# Altium PCB MainBoardPCB_PWR.PcbDoc (part 23 of 29)
Units mm, origin at the board's own origin, x right, y up, seen from the top; angles counter-clockwise.
Board outline 333.63 x 349.38 mm, 16 copper layers (L1, L2 (GND), L3 (Sign), L4 (GND), L5 (Sign), L6 (PWR/GND), L7(PWR/GND), L8 (PWR/GND), L9 (PWR/GND), L10 (PWR/GND), L11 (PWR/GND), L12 (Sign), L13 (GND), L14 (Sign), L15 (GND), L16), stack 2.503 mm thick; 2187 components, 1615 nets, 7987 pads, 1695 vias.
Unrouted connection lines stored in the file: 4757.
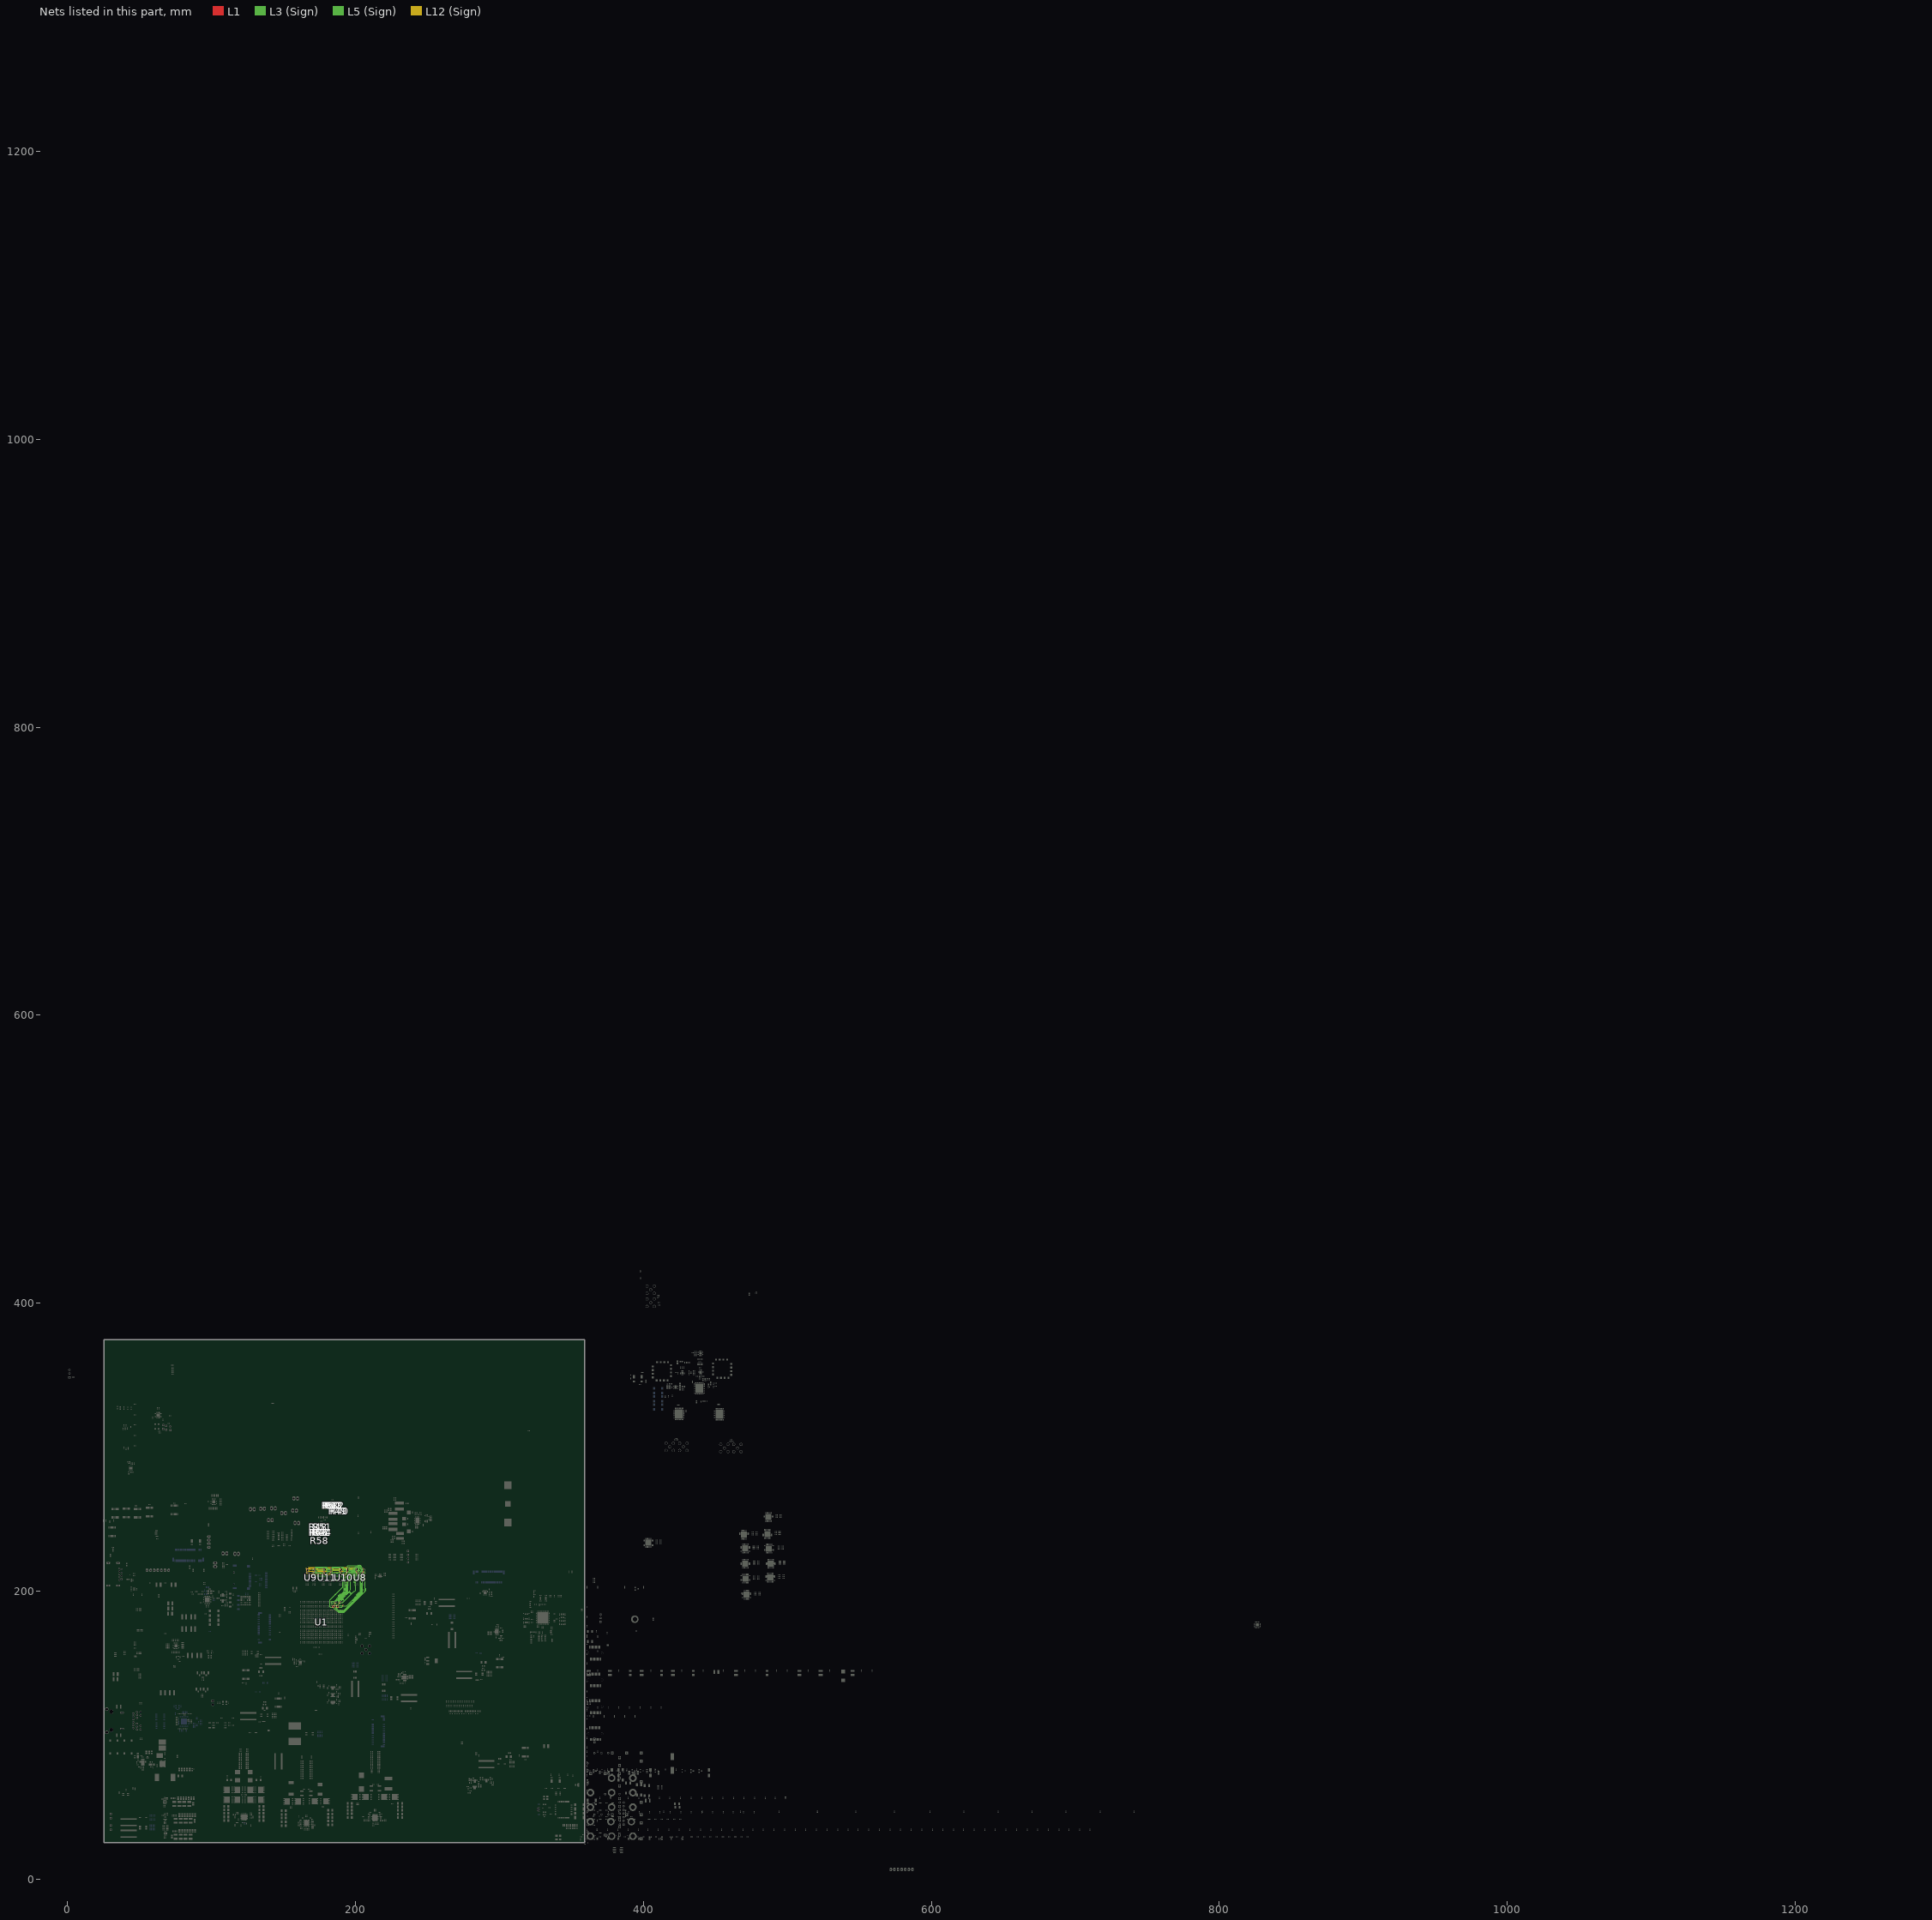
[diagram p18: the nets of this part, all layers, seen from the top]

## Via types
v1: diameter 0.5, hole 0.2, L1 to L16, 786 vias
v2: diameter 0.5/0.35/0.35/0.35/0.35/0.35/0.35/0.35/0.35/0.35/0.35/0.35/0.35/0.35/0.35/0.5 (per signal layer), hole 0.15, L1 to L16, tented both sides, 164 vias
v3: diameter 2.54, hole 1.02, L1 to L16, 152 vias
v4: diameter 0.5/0.35/0.35/0.35/0.35/0.35/0.35/0.35/0.35/0.35/0.35/0.35/0.35/0.35/0.35/0.5 (per signal layer), hole 0.2, L1 to L16, tented both sides, 100 vias
v5: diameter 0.45, hole 0.15, L1 to L16, 79 vias
v6: diameter 0.35/0/0.35 (per signal layer), hole 0.127, L1 to L3 (Sign), tented both sides, 78 vias
v7: diameter 0.45/0.45/0.45/0.45/0.45/0.45/0.45/0.45/0.45/0.45/0.45/0.45/0.45/0.45/0.45/0.45 (per signal layer), hole 0.15, L1 to L16, 65 vias
v8: diameter 0.4, hole 0.15, L1 to L16, 61 vias
v9: diameter 0.2, hole 0.1, L1 to L16, 35 vias
v10: diameter 0.5, hole 0.2, L1 to L16, tented both sides, 32 vias
v11: diameter 0.2/0/0.2 (per signal layer), hole 0.1, L1 to L3 (Sign), 28 vias
v12: diameter 0.4, hole 0.2, L1 to L16, 16 vias
v13: diameter 0.25, hole 0.2, L1 to L16, 16 vias
v14: diameter 0.3, hole 0.2, L1 to L16, 15 vias
v15: diameter 0.5/0.35/0.35/0.35/0.35/0.35/0.35/0.35/0.35/0.35/0.35/0.35/0.35/0.35/0.35/0.45 (per signal layer), hole 0.15, L1 to L16, tented both sides, 10 vias
v16: diameter 5, hole 3, L1 to L16, 9 vias
v17: diameter 0.2/0/0.2 (per signal layer), hole 0.1, L1 to L3 (Sign), tented both sides, 9 vias
v18: diameter 0.35/0/0.35 (per signal layer), hole 0.127, L1 to L3 (Sign), 7 vias
v19: diameter 0.35/0/0.35 (per signal layer), hole 0.127, L14 (Sign) to L16, tented both sides, 5 vias
v20: diameter 1.65, hole 1.65, L1 to L16, 4 vias
v21: diameter 1.15, hole 1.15, L1 to L16, 4 vias
v22: diameter 0.35, hole 0.127, L1 to L2 (GND), 2 vias
v23: diameter 0.4, hole 0.2, L1 to L16, tented both sides, 2 vias
v24: diameter 0.35, hole 0.127, L1 to L2 (GND), tented both sides, 2 vias
v25: diameter 0.508, hole 0.127, L1 to L2 (GND), 2 vias
v26: diameter 0.508, hole 0.127, L2 (GND) to L3 (Sign), 2 vias
v27: diameter 0.35, hole 0.127, L3 (Sign) to L6 (PWR/GND), tented both sides, 2 vias
v28: diameter 0.5, hole 0.2, L3 (Sign) to L6 (PWR/GND), tented both sides, 2 vias
v29: diameter 5.5, hole 3.5, L1 to L16, 1 vias
v30: diameter 0.45/0.45/0.45 (per signal layer), hole 0.15, L1 to L3 (Sign), 1 vias
v31: diameter 0.35/0.35/0.35 (per signal layer), hole 0.127, L1 to L3 (Sign), tented both sides, 1 vias
v32: diameter 0.45/0/0.45 (per signal layer), hole 0.15, L1 to L3 (Sign), tented both sides, 1 vias
v33: diameter 0.45/0/0.45 (per signal layer), hole 0.2, L14 (Sign) to L16, tented both sides, 1 vias
v34: diameter 0.35, hole 0.127, L2 (GND) to L3 (Sign), 1 vias

## Nets (pads, with @x,y where several pads share a name; then routed paths per layer and width w, separated by ;. In a path a pad name is that pad's centre, name@x,y a point inside that pad or via, vN(x,y) a via of type N, cw(c..) or ccw(c..) an arc to the next point about the centre after c; other vN are vias at no path point) (continued)
DDR4_A5: R41.1 U1.AK27 U8.P5 U9.P5 U10.P5 U11.P5 | length 97.8
  L1 w0.116: U9.P5@166.406,213.848 166.802,214.245 v2(166.805,214.245) ; U11.P5@177.866,213.848 178.263,214.245 v2(178.265,214.245) ; U10.P5@189.327,213.848 189.723,214.245 v2(189.726,214.245) ; U1.AK27@190.927,189.927 v6(191.414,190.414) ; v2(200.384,214.252) U8.P5@200.787,213.848
  L12 (Sign) w0.092: 165.877,214.648 166.281,214.245 ; v2@166.802,214.245 166.281,214.245 ; v2@178.263,214.245 173.921,214.245 ; 195.936,214.77 195.787,214.77 ; v2@200.391,214.245 199.872,214.245 199.347,214.77 199.123,214.77 198.765,214.77 cw(c198.765,214.859) 198.675,214.859 198.675,215.005 ccw(c198.586,215.005) 198.586,215.094 198.317,215.094 ccw(c198.317,215.005) 198.228,215.005 198.228,214.859 cw(c198.138,214.859) 198.138,214.77 197.869,214.77 cw(c197.869,214.859) 197.78,214.859 197.78,215.005 ccw(c197.69,215.005) 197.69,215.094 197.422,215.094 ccw(c197.422,215.005) 197.332,215.005 197.332,214.77 197.332,214.235 cw(c197.242,214.235) 197.242,214.145 196.974,214.145 cw(c196.974,214.235) 196.884,214.235 196.884,214.68 ccw(c196.795,214.68) 196.795,214.77 196.05,214.77 195.787,214.77 ; 166.281,214.245 v2(166.805,214.245) 166.995,214.435 167.219,214.435 167.372,214.588 167.83,214.588 168.709,215.468 172.697,215.468 173.921,214.245 ; 173.921,214.245 178.583,214.245 ; 173.921,214.245 v2(178.265,214.245) 178.583,214.245 ; 178.583,214.245 178.981,214.643 179.832,214.643 180.657,215.468 183.655,215.468 184.366,214.757 188.689,214.757 189.202,214.245 v2(189.726,214.245) 189.916,214.435 190.139,214.435 190.293,214.588 190.75,214.588 191.63,215.468 191.694,215.468 194.424,215.468 195.089,215.468 195.787,214.77
  L3 (Sign) w0.092: v6(191.414,190.414) 191.056,190.055 189.852,190.055 189.698,189.901 189.135,189.901 188.921,190.115 188.437,190.115 188.249,190.304 188.249,190.569 188.437,190.758 188.486,190.758 188.862,191.133 188.862,191.316 189.116,191.57 189.116,191.687 188.963,191.839 188.963,191.855 188.709,192.109 188.709,192.659 188.093,193.275 188.093,193.575 188.164,193.645 ccw(c188.093,193.715) 188.164,193.785 188.158,193.791 cw(c188.228,193.861) 188.158,193.931 188.298,194.072 cw(c188.368,194.002) 188.438,194.072 188.514,193.996 188.549,193.961 ccw(c188.619,194.031) 188.69,193.961 188.83,194.101 ccw(c188.76,194.172) 188.83,194.242 188.795,194.277 188.719,194.353 cw(c188.789,194.423) 188.719,194.493 188.86,194.633 cw(c188.93,194.563) 189,194.633 189.076,194.557 189.319,194.314 ccw(c189.389,194.385) 189.459,194.314 189.6,194.455 ccw(c189.529,194.525) 189.6,194.595 189.357,194.838 189.281,194.914 cw(c189.351,194.984) 189.281,195.054 189.421,195.195 cw(c189.491,195.125) 189.561,195.195 189.637,195.119 189.88,194.876 ccw(c189.95,194.946) 190.021,194.876 190.161,195.016 ccw(c190.091,195.086) 190.161,195.157 189.918,195.399 189.842,195.475 cw(c189.912,195.546) 189.842,195.616 189.982,195.756 cw(c190.053,195.686) 190.123,195.756 190.199,195.68 190.442,195.437 ccw(c190.512,195.507) 190.582,195.437 190.722,195.578 ccw(c190.652,195.648) 190.722,195.718 190.48,195.961 190.404,196.037 cw(c190.474,196.107) 190.403,196.177 190.544,196.318 cw(c190.614,196.247) 190.684,196.318 190.76,196.242 191.003,195.999 ccw(c191.073,196.069) 191.144,195.999 191.284,196.139 ccw(c191.214,196.209) 191.284,196.279 191.041,196.522 190.965,196.598 cw(c191.035,196.668) 190.965,196.739 191.105,196.879 cw(c191.175,196.809) 191.246,196.879 191.322,196.803 191.565,196.56 ccw(c191.635,196.63) 191.705,196.56 191.845,196.7 ccw(c191.775,196.771) 191.845,196.841 191.602,197.084 191.526,197.16 cw(c191.597,197.23) 191.526,197.3 191.667,197.44 cw(c191.737,197.37) 191.807,197.44 191.883,197.364 192.126,197.122 ccw(c192.196,197.192) 192.266,197.122 192.407,197.262 ccw(c192.337,197.332) 192.407,197.402 192.164,197.645 192.088,197.721 cw(c192.158,197.791) 192.088,197.862 192.228,198.002 cw(c192.298,197.932) 192.369,198.002 192.445,197.926 192.687,197.683 ccw(c192.758,197.753) 192.828,197.683 192.968,197.823 ccw(c192.898,197.894) 192.968,197.964 192.725,198.207 192.649,198.283 cw(c192.719,198.353) 192.649,198.423 192.79,198.563 cw(c192.86,198.493) 192.93,198.563 193.006,198.487 193.249,198.244 ccw(c193.319,198.315) 193.389,198.244 193.53,198.385 ccw(c193.459,198.455) 193.53,198.525 193.287,198.768 193.211,198.844 cw(c193.281,198.914) 193.211,198.984 193.351,199.125 cw(c193.421,199.055) 193.491,199.125 193.567,199.049 193.81,198.806 ccw(c193.881,198.876) 193.951,198.806 194.091,198.946 ccw(c194.021,199.016) 194.091,199.087 193.848,199.329 193.772,199.406 cw(c193.842,199.476) 193.772,199.546 193.913,199.686 cw(c193.983,199.616) 194.053,199.686 194.129,199.61 194.372,199.367 ccw(c194.442,199.438) 194.512,199.367 194.653,199.508 ccw(c194.582,199.578) 194.653,199.648 194.48,199.821 cw(c194.55,199.891) 194.48,199.961 194.69,200.172 194.742,200.223 194.742,206.035 195.161,206.454 195.161,206.802 195.944,207.585 195.944,210.015 200.173,214.245 200.391,214.245 v2(200.384,214.252)
DDR4_A6: R43.1 U1.AF27 U8.P2 U9.P2 U10.P2 U11.P2 | length 90.7
  L1 w0.116: U9.P2@171.206,213.848 v2(171.609,214.252) ; U11.P2@182.666,213.848 v2(183.07,214.252) ; U1.AF27@186.927,189.927 v6(187.414,189.44) ; U10.P2@194.127,213.848 v1(194.53,214.252) ; U8.P2@205.587,213.848 v2(205.991,214.252)
  L5 (Sign) w0.092: v2(171.609,214.252) 171.935,214.252 172.314,214.63 179.776,214.63 180.538,213.868 182.113,213.868 182.497,214.252 v2(183.07,214.252) 183.369,214.252 183.747,214.63 191.237,214.63 191.999,213.868 193.573,213.868 193.957,214.252 v1(194.53,214.252) 194.757,214.252 195.153,214.648 195.288,214.648 ccw(c195.288,214.738) 195.377,214.738 195.377,214.812 cw(c195.467,214.812) 195.467,214.902 195.736,214.902 cw(c195.736,214.812) 195.825,214.812 195.825,214.648 195.825,214.484 ccw(c195.915,214.484) 195.915,214.394 196.183,214.394 ccw(c196.183,214.484) 196.273,214.484 196.273,214.648 196.273,214.812 cw(c196.363,214.812) 196.363,214.902 196.631,214.902 cw(c196.631,214.812) 196.721,214.812 196.721,214.648 196.721,214.575 ccw(c196.81,214.575) 196.81,214.485 197.079,214.485 ccw(c197.079,214.575) 197.169,214.575 197.169,214.648 197.169,214.812 cw(c197.258,214.812) 197.258,214.902 197.527,214.902 cw(c197.527,214.812) 197.616,214.812 197.616,214.648 197.616,214.575 ccw(c197.706,214.575) 197.706,214.485 197.975,214.485 ccw(c197.975,214.575) 198.064,214.575 198.064,214.648 198.064,214.812 cw(c198.154,214.812) 198.154,214.902 198.422,214.902 cw(c198.422,214.812) 198.512,214.812 198.512,214.648 198.512,214.575 ccw(c198.602,214.575) 198.602,214.485 198.87,214.485 ccw(c198.87,214.575) 198.96,214.575 198.96,214.648 198.96,214.812 cw(c199.049,214.812) 199.049,214.902 199.318,214.902 cw(c199.318,214.812) 199.408,214.812 199.408,214.648 199.408,214.575 ccw(c199.497,214.575) 199.497,214.485 199.766,214.485 ccw(c199.766,214.575) 199.855,214.575 199.855,214.648 199.855,214.678 cw(c199.945,214.678) 199.945,214.767 200.214,214.767 cw(c200.214,214.678) 200.303,214.678 200.303,214.648 ccw(c200.379,214.648) 200.379,214.573 200.675,214.573 ccw(c200.675,214.648) 200.751,214.648 201.199,214.648 201.199,214.639 ccw(c201.288,214.639) 201.288,214.549 201.557,214.549 ccw(c201.557,214.639) 201.647,214.639 201.647,214.648 201.647,214.812 cw(c201.736,214.812) 201.736,214.902 202.005,214.902 cw(c202.005,214.812) 202.094,214.812 202.094,214.738 ccw(c202.184,214.738) 202.184,214.648 202.578,214.648 202.679,214.648 203.474,213.853 203.608,213.853 cw(c203.608,213.763) 203.698,213.763 ccw(c203.787,213.763) 203.787,213.674 204.056,213.674 ccw(c204.056,213.763) 204.146,213.763 204.146,213.77 cw(c204.229,213.77) 204.229,213.853 205.019,213.853 205.417,214.252 v2(205.991,214.252)
  L3 (Sign) w0.092: v6(187.414,189.44) 187.414,187.388 188.008,186.794 192.221,186.794 197.512,192.086 198.535,193.108 ccw(c198.465,193.179) 198.535,193.249 198.239,193.544 cw(c198.31,193.615) 198.239,193.685 198.38,193.825 cw(c198.45,193.755) 198.52,193.825 198.816,193.529 ccw(c198.886,193.6) 198.956,193.529 199.097,193.67 ccw(c199.026,193.74) 199.097,193.81 198.801,194.106 cw(c198.871,194.176) 198.801,194.246 198.941,194.387 cw(c199.011,194.316) 199.082,194.387 199.377,194.091 ccw(c199.448,194.161) 199.518,194.091 199.658,194.231 ccw(c199.588,194.301) 199.658,194.372 ; 199.658,194.372 199.36,194.67 cw(c199.43,194.74) 199.36,194.81 199.5,194.95 cw(c199.57,194.88) 199.641,194.95 199.939,194.652 ccw(c200.009,194.722) 200.079,194.652 200.219,194.793 ccw(c200.149,194.863) 200.219,194.933 199.921,195.231 cw(c199.992,195.301) 199.921,195.372 200.062,195.512 cw(c200.132,195.442) 200.202,195.512 200.5,195.214 ccw(c200.57,195.284) 200.641,195.214 200.781,195.354 ccw(c200.711,195.424) 200.781,195.494 200.483,195.793 cw(c200.553,195.863) 200.483,195.933 200.623,196.073 cw(c200.693,196.003) 200.764,196.073 201.062,195.775 ccw(c201.132,195.845) 201.202,195.775 201.413,195.986 201.553,196.126 203.54,198.113 203.54,211.094 203.893,211.448 205.346,211.448 205.618,211.72 205.618,212.745 205.321,213.042 205.321,213.884 205.678,214.24 205.979,214.24 v2(205.991,214.252)
DDR4_A7: R45.1 U1.AE27 U8.R5 U9.R5 U10.R5 U11.R5 | length 99.2
  L1 w0.116: U9.R5@166.406,214.648 v2@166.705,214.947 ; v2(166.703,214.947) v2@166.705,214.947 ; v2@166.802,215.045 v2@166.705,214.947 ; U11.R5@177.866,214.648 178.263,215.045 v2(178.265,215.045) ; U1.AE27@185.927,189.927 v6(186.414,190.414) v6@186.414,190.44 ; U10.R5@189.327,214.648 189.723,215.045 v2(189.726,215.045) ; v2(200.384,215.052) U8.R5@200.787,214.648
  L12 (Sign) w0.092: 165.885,215.448 166.385,214.947 v2(166.703,214.947) 166.708,214.947 168.129,216.368 172.635,216.368 173.959,215.045 ; v2@178.263,215.045 173.959,215.045 ; v2@189.629,214.947 v2(189.726,215.045) ; v2@200.384,215.045 199.979,215.045 199.053,215.97 198.996,216.027 198.862,216.027 ccw(c198.862,215.937) 198.772,215.937 198.772,215.67 cw(c198.683,215.67) 198.683,215.58 198.414,215.58 cw(c198.414,215.67) 198.325,215.67 198.325,216.027 198.325,216.206 ccw(c198.235,216.206) 198.235,216.296 197.966,216.296 ccw(c197.966,216.206) 197.877,216.206 197.877,216.027 197.877,215.67 cw(c197.787,215.67) 197.787,215.58 197.519,215.58 cw(c197.519,215.67) 197.429,215.67 197.429,215.937 ccw(c197.339,215.937) 197.339,216.027 196.888,216.027 195.897,216.027 195.556,216.368 191.049,216.368 v2(189.726,215.045) ; 173.959,215.045 v2(178.265,215.045) v2@178.456,215.045 ; 173.959,215.045 v2@178.456,215.045 ; v2@178.456,215.045 178.778,215.367 179.807,215.367 180.861,216.421 183.381,216.421 184.537,215.265 189.505,215.265 v2(189.726,215.045)
  L3 (Sign) w0.092: v6(186.414,190.414) 186.414,190.462 186.145,190.732 184.949,191.927 184.949,192.645 185.205,192.901 186.3,192.901 187.129,193.718 187.983,194.561 cw(c188.041,194.502) 188.1,194.56 ; 188.094,194.566 188.099,194.561 ; 188.093,194.567 ccw(c188.164,194.636) 188.233,194.566 188.375,194.705 ccw(c188.305,194.776) 188.376,194.845 188.324,194.897 188.085,195.14 cw(c188.156,195.209) 188.086,195.28 188.228,195.419 cw(c188.298,195.349) 188.368,195.418 188.607,195.176 188.654,195.128 ccw(c188.725,195.198) 188.795,195.127 188.936,195.266 ccw(c188.866,195.337) 188.937,195.407 188.89,195.455 188.874,195.47 cw(c188.945,195.54) 188.875,195.611 189.017,195.75 cw(c189.086,195.68) 189.157,195.749 189.172,195.733 189.223,195.683 ccw(c189.293,195.752) 189.363,195.682 189.504,195.821 ccw(c189.435,195.892) 189.505,195.961 cw(c189.556,196.011) 189.506,196.062 189.597,196.151 189.657,196.211 189.894,196.445 cw(c189.939,196.4) 189.984,196.444 ; 189.978,196.45 189.983,196.445 ; 189.978,196.451 ccw(c190.048,196.521) 190.118,196.45 190.259,196.59 ccw(c190.19,196.66) 190.26,196.73 190.222,196.768 189.917,197.078 cw(c189.987,197.148) 189.918,197.219 190.059,197.358 cw(c190.129,197.287) 190.199,197.357 190.505,197.047 190.539,197.013 ccw(c190.61,197.082) 190.679,197.012 190.821,197.151 ccw(c190.751,197.222) 190.822,197.291 190.788,197.326 190.513,197.605 cw(c190.583,197.675) 190.514,197.745 190.655,197.885 cw(c190.725,197.814) 190.795,197.884 191.071,197.604 191.1,197.574 ccw(c191.171,197.644) 191.241,197.573 191.382,197.712 ccw(c191.313,197.783) 191.383,197.853 191.353,197.883 191.074,198.167 cw(c191.144,198.237) 191.075,198.307 191.216,198.447 cw(c191.286,198.376) 191.356,198.446 191.636,198.162 191.662,198.136 ccw(c191.733,198.205) 191.802,198.135 191.944,198.274 ccw(c191.874,198.345) 191.945,198.414 191.919,198.441 191.635,198.728 cw(c191.706,198.798) 191.636,198.869 191.777,199.008 cw(c191.847,198.937) 191.918,199.007 192.201,198.719 192.223,198.697 ccw(c192.294,198.767) 192.364,198.696 192.505,198.835 ccw(c192.435,198.906) 192.506,198.976 192.484,198.998 192.196,199.29 cw(c192.267,199.36) 192.197,199.43 192.339,199.57 cw(c192.409,199.499) 192.479,199.569 192.767,199.277 192.792,199.252 ccw(c192.862,199.321) 192.932,199.251 193.073,199.39 ccw(c193.004,199.461) 193.074,199.53 cw(c193.099,199.555) 193.075,199.58 193.191,199.695 193.294,199.797 ; 193.294,199.896 193.294,199.797 ; v2(200.384,215.052) 200.142,215.052 194.996,209.906 193.656,209.906 193.294,209.544 193.294,208.826 192.396,207.928 192.396,206.626 193.294,205.727 193.294,205.529 cw(c193.294,205.471) 193.352,205.471 193.352,205.19 cw(c193.294,205.19) 193.294,205.132 193.294,204.735 cw(c193.294,204.678) 193.35,204.678 193.35,204.394 cw(c193.294,204.394) 193.294,204.338 193.16,204.338 ccw(c193.16,204.238) 193.061,204.238 193.061,204.04 ccw(c193.16,204.04) 193.16,203.941 193.294,203.941 cw(c193.294,203.884) 193.35,203.884 193.35,203.6 cw(c193.294,203.6) 193.294,203.544 193.294,203.147 cw(c193.294,203.09) 193.35,203.09 193.35,202.806 cw(c193.294,202.806) 193.294,202.75 193.18,202.75 ccw(c193.18,202.65) 193.08,202.65 193.08,202.452 ccw(c193.18,202.452) 193.18,202.353 193.294,202.353 cw(c193.294,202.296) 193.35,202.296 193.35,202.012 cw(c193.294,202.012) 193.294,201.956 192.495,201.956 ccw(c192.495,201.856) 192.396,201.856 192.396,201.658 ccw(c192.495,201.658) 192.495,201.559 193.294,201.559 cw(c193.294,201.502) 193.35,201.502 193.35,201.218 cw(c193.294,201.218) 193.294,201.162 192.495,201.162 ccw(c192.495,201.062) 192.396,201.062 192.396,200.864 ccw(c192.495,200.864) 192.495,200.765 193.294,200.765 193.81,200.765 cw(c193.81,200.665) 193.909,200.665 193.909,200.467 cw(c193.81,200.467) 193.81,200.368 193.393,200.368 ccw(c193.393,200.268) 193.294,200.268 193.294,199.971 193.294,199.797
DDR4_A8: R47.1 U1.AF26 U8.R2 U9.R2 U10.R2 U11.R2 | length 93.6
  L1 w0.116: U9.R2@171.206,214.648 v2(171.609,215.052) ; U11.R2@182.666,214.648 v2(183.07,215.052) ; v6(186.44,189.414) U1.AF26@186.927,188.927 ; U10.R2@194.127,214.648 v1(194.53,215.052) ; U8.R2@205.587,214.648 v2(205.991,215.052)
  L5 (Sign) w0.092: 170.382,214.731 170.703,215.052 v2(171.609,215.052) 172.872,216.315 179.303,216.315 180.97,214.648 181.866,214.648 182.27,215.052 v2(183.07,215.052) 184.333,216.315 190.764,216.315 192.43,214.648 193.327,214.648 193.73,215.052 v1(194.53,215.052) 194.972,215.494 195.123,215.644 195.123,216.23 195.207,216.315 195.415,216.315 195.549,216.315 ccw(c195.549,216.404) 195.639,216.404 195.639,216.512 cw(c195.728,216.512) 195.728,216.601 195.997,216.601 cw(c195.997,216.512) 196.087,216.512 196.087,216.404 ccw(c196.176,216.404) 196.176,216.315 197.307,216.315 199.517,216.315 ccw(c199.517,216.399) 199.601,216.399 199.601,216.428 cw(c199.691,216.428) 199.691,216.518 199.96,216.518 cw(c199.96,216.428) 200.049,216.428 200.049,216.315 200.049,216.201 ccw(c200.139,216.201) 200.139,216.111 200.407,216.111 ccw(c200.407,216.201) 200.497,216.201 200.497,216.315 200.497,216.428 cw(c200.587,216.428) 200.587,216.518 200.855,216.518 cw(c200.855,216.428) 200.945,216.428 200.945,216.315 200.945,216.255 ccw(c201.034,216.255) 201.034,216.165 201.303,216.165 ccw(c201.303,216.255) 201.393,216.255 201.393,216.315 201.393,216.428 cw(c201.482,216.428) 201.482,216.518 201.751,216.518 cw(c201.751,216.428) 201.84,216.428 201.84,216.315 201.84,216.201 ccw(c201.93,216.201) 201.93,216.111 202.199,216.111 ccw(c202.199,216.201) 202.288,216.201 202.288,216.315 202.288,216.428 cw(c202.378,216.428) 202.378,216.518 202.646,216.518 cw(c202.646,216.428) 202.736,216.428 202.736,216.315 202.736,216.201 ccw(c202.826,216.201) 202.826,216.111 203.094,216.111 ccw(c203.094,216.201) 203.184,216.201 203.184,216.225 cw(c203.273,216.225) 203.273,216.315 203.408,216.315 203.568,216.154 203.568,215.557 203.975,215.151 204.015,215.151 204.063,215.103 204.063,214.695 204.109,214.648 204.787,214.648 205.191,215.052 v2(205.991,215.052)
  L3 (Sign) w0.092: v6(186.44,189.414) 186.44,188.977 186.069,188.606 186.069,188.15 188.409,185.809 191.829,185.809 204.813,198.793 204.813,200.292 204.813,200.391 ccw(c204.713,200.391) 204.713,200.49 204.448,200.49 cw(c204.448,200.589) 204.349,200.589 204.349,200.788 cw(c204.448,200.788) 204.448,200.887 204.813,200.887 205.177,200.887 ccw(c205.177,200.986) 205.276,200.986 205.276,201.185 ccw(c205.177,201.185) 205.177,201.284 204.813,201.284 204.448,201.284 cw(c204.448,201.383) 204.349,201.383 204.349,201.582 cw(c204.448,201.582) 204.448,201.681 204.713,201.681 ccw(c204.713,201.78) 204.813,201.78 204.813,203.035 204.813,210.362 205.054,210.604 205.543,210.604 206.158,211.219 206.158,212.676 205.573,213.261 205.573,213.688 205.816,213.931 205.857,213.931 205.858,213.931 206.124,213.931 206.125,213.931 206.134,213.931 206.311,214.109 206.311,214.118 206.312,214.385 206.311,214.731 v2(205.991,215.052)
DDR4_A9: R48.1 U1.AG26 U8.R4 U9.R4 U10.R4 U11.R4 | length 89.3
  L1 w0.116: U9.R4@167.206,214.648 167.602,215.045 167.605,215.042 v2(167.605,214.909) ; U11.R4@178.666,214.648 179.063,215.045 v2(179.065,215.045) ; U1.AG26@187.927,188.927 v6(188.414,189.414) ; U10.R4@190.127,214.648 190.523,215.045 v1(190.526,215.045) ; v1(201.184,215.052) U8.R4@201.587,214.648
  L12 (Sign) w0.092: v2(167.605,214.909) 167.643,214.909 168.91,216.176 172.434,216.176 173.929,214.681 178.701,214.681 v2(179.065,215.045) 179.762,215.045 180.946,216.229 183.301,216.229 184.488,215.041 188.806,215.041 189.221,214.626 189.836,214.626 190.254,215.045 v1(190.526,215.045) 191.657,216.176 191.792,216.176 cw(c191.792,216.087) 191.881,216.087 191.881,215.762 ccw(c191.971,215.762) 191.971,215.672 192.24,215.672 ccw(c192.24,215.762) 192.329,215.762 192.329,216.087 cw(c192.419,216.087) 192.419,216.176 192.777,216.176 193.225,216.176 193.583,216.176 cw(c193.583,216.087) 193.673,216.087 193.673,215.762 ccw(c193.762,215.762) 193.762,215.672 194.031,215.672 ccw(c194.031,215.762) 194.12,215.762 194.12,216.087 cw(c194.21,216.087) 194.21,216.176 194.589,216.176 195.354,216.176 196.215,215.316 196.349,215.316 ccw(c196.349,215.405) 196.439,215.405 cw(c196.528,215.405) 196.528,215.495 196.797,215.495 cw(c196.797,215.405) 196.887,215.405 ccw(c196.976,215.405) 196.976,215.316 197.079,215.316 199.35,215.316 199.942,214.724 200.856,214.724 v1(201.184,215.052)
  L3 (Sign) w0.092: v6(188.414,189.414) 188.414,189.866 188.057,190.224 188.057,190.649 188.357,190.949 188.406,190.949 188.659,191.202 188.659,191.339 188.662,191.343 188.662,191.387 188.771,191.497 188.771,191.776 188.583,191.964 188.567,191.964 188.517,192.014 188.517,192.568 187.901,193.184 187.901,193.947 194.101,200.146 194.101,200.939 194.101,200.952 ccw(c194.002,200.952) 194.002,201.051 193.642,201.051 cw(c193.642,201.151) 193.542,201.151 193.542,201.349 cw(c193.642,201.349) 193.642,201.448 194.101,201.448 194.394,201.448 ccw(c194.394,201.548) 194.494,201.548 194.494,201.746 ccw(c194.394,201.746) 194.394,201.845 194.101,201.845 193.642,201.845 cw(c193.642,201.945) 193.542,201.945 193.542,202.143 cw(c193.642,202.143) 193.642,202.242 194.101,202.242 194.394,202.242 ccw(c194.394,202.342) 194.494,202.342 194.494,202.54 ccw(c194.394,202.54) 194.394,202.639 194.101,202.639 193.642,202.639 cw(c193.642,202.739) 193.542,202.739 193.542,202.937 cw(c193.642,202.937) 193.642,203.036 194.101,203.036 194.394,203.036 ccw(c194.394,203.136) 194.494,203.136 194.494,203.334 ccw(c194.394,203.334) 194.394,203.433 194.101,203.433 193.642,203.433 cw(c193.642,203.533) 193.542,203.533 193.542,203.731 cw(c193.642,203.731) 193.642,203.83 194.101,203.83 194.394,203.83 ccw(c194.394,203.93) 194.494,203.93 194.494,204.128 ccw(c194.394,204.128) 194.394,204.227 194.101,204.227 193.642,204.227 cw(c193.642,204.327) 193.542,204.327 193.542,204.525 cw(c193.642,204.525) 193.642,204.624 194.101,204.624 194.394,204.624 ccw(c194.394,204.724) 194.494,204.724 194.494,204.922 ccw(c194.394,204.922) 194.394,205.021 194.2,205.021 cw(c194.2,205.121) 194.101,205.121 194.101,205.319 cw(c194.2,205.319) 194.2,205.418 194.394,205.418 ccw(c194.394,205.518) 194.494,205.518 194.494,205.716 ccw(c194.394,205.716) 194.394,205.815 194.2,205.815 cw(c194.2,205.915) 194.101,205.915 194.101,206.014 195.752,207.664 195.752,207.764 ccw(c195.652,207.764) 195.652,207.863 194.338,207.863 cw(c194.338,207.962) 194.239,207.962 194.239,208.161 cw(c194.338,208.161) 194.338,208.26 195.652,208.26 ccw(c195.652,208.359) 195.752,208.359 195.752,208.558 ccw(c195.652,208.558) 195.652,208.657 194.989,208.657 cw(c194.989,208.756) 194.889,208.756 194.889,208.954 cw(c194.989,208.954) 194.989,209.054 195.652,209.054 ccw(c195.652,209.153) 195.752,209.153 195.752,209.351 ccw(c195.652,209.351) 195.652,209.451 195.251,209.451 cw(c195.251,209.55) 195.151,209.55 195.151,209.748 cw(c195.251,209.748) 195.251,209.848 195.652,209.848 ccw(c195.652,209.947) 195.752,209.947 195.752,210.071 195.752,210.183 200.211,214.643 200.775,214.643 v1(201.184,215.052)
DDR4_A10: R49.1 U1.AE29 U8.M3 U9.M3 U10.M3 U11.M3 | length 90.7
  L1 w0.116: v2(170.002,212.652) U9.M3@170.406,212.248 ; v2(181.463,212.652) U11.M3@181.866,212.248 ; v6(185.44,192.414) U1.AE29@185.927,191.927 ; v2(192.923,212.652) U10.M3@193.327,212.248 ; v15(204.384,212.652) U8.M3@204.787,212.248
  L5 (Sign) w0.092: v2(170.002,212.652) 170.239,212.889 170.605,212.889 170.772,213.055 172.042,213.055 172.842,212.255 179.459,212.255 179.855,212.652 v2(181.463,212.652) 182.306,212.652 182.71,213.055 183.502,213.055 184.302,212.255 190.919,212.255 191.316,212.652 v2(192.923,212.652) 192.93,212.645 193.871,212.645 194.23,213.004 195.059,213.004 195.434,212.63 195.568,212.63 ccw(c195.568,212.719) 195.658,212.719 195.658,212.844 cw(c195.747,212.844) 195.747,212.933 196.016,212.933 cw(c196.016,212.844) 196.106,212.844 196.106,212.63 196.106,212.416 ccw(c196.195,212.416) 196.195,212.326 196.464,212.326 ccw(c196.464,212.416) 196.553,212.416 196.553,212.63 196.553,212.844 cw(c196.643,212.844) 196.643,212.933 196.912,212.933 cw(c196.912,212.844) 197.001,212.844 197.001,212.63 197.001,212.416 ccw(c197.091,212.416) 197.091,212.326 197.359,212.326 ccw(c197.359,212.416) 197.449,212.416 197.449,212.63 197.449,212.844 cw(c197.539,212.844) 197.539,212.933 197.807,212.933 cw(c197.807,212.844) 197.897,212.844 197.897,212.63 197.897,212.416 ccw(c197.986,212.416) 197.986,212.326 198.255,212.326 ccw(c198.255,212.416) 198.345,212.416 198.345,212.63 198.345,212.762 cw(c198.434,212.762) 198.434,212.852 198.703,212.852 cw(c198.703,212.762) 198.792,212.762 198.792,212.719 ccw(c198.882,212.719) 198.882,212.63 200.457,212.63 200.654,212.63 201.028,212.255 202.07,212.255 202.466,212.652 202.646,212.652 cw(c202.646,212.532) 202.766,212.532 202.766,212.301 ccw(c202.886,212.301) 202.886,212.181 203.246,212.181 ccw(c203.246,212.301) 203.366,212.301 203.366,212.652 203.366,212.744 cw(c203.486,212.744) 203.486,212.864 203.847,212.864 cw(c203.847,212.744) 203.967,212.744 203.967,212.685 ccw(c204,212.685) 204,212.652 v15(204.384,212.652)
  L3 (Sign) w0.092: v6(185.44,192.414) 185.525,192.329 185.525,191.783 187.735,189.573 187.735,189.119 188.028,188.826 189.842,188.826 189.984,188.968 190.599,188.968 190.66,189.029 191.267,189.636 193.756,189.636 198.92,194.8 198.92,194.805 200.279,196.164 200.611,196.496 cw(c200.681,196.426) 200.751,196.496 201.013,196.234 ccw(c201.083,196.304) 201.154,196.234 201.294,196.375 ccw(c201.224,196.445) 201.294,196.515 200.962,196.847 200.63,197.179 cw(c200.7,197.249) 200.63,197.319 200.77,197.46 cw(c200.84,197.39) 200.91,197.46 201.242,197.128 201.575,196.796 ccw(c201.645,196.866) 201.715,196.796 201.855,196.936 ccw(c201.785,197.006) 201.855,197.076 201.523,197.408 201.191,197.741 cw(c201.261,197.811) 201.191,197.881 201.331,198.021 cw(c201.402,197.951) 201.472,198.021 201.804,197.689 202.136,197.357 ccw(c202.206,197.427) 202.276,197.357 202.417,197.497 ccw(c202.347,197.568) 202.417,197.638 202.085,197.97 201.753,198.302 cw(c201.823,198.372) 201.753,198.442 201.893,198.583 cw(c201.963,198.513) 202.033,198.583 202.365,198.251 202.697,197.918 ccw(c202.768,197.989) 202.838,197.918 202.978,198.059 ccw(c202.908,198.129) 202.978,198.199 202.646,198.531 202.314,198.863 cw(c202.384,198.934) 202.314,199.004 202.454,199.144 cw(c202.525,199.074) 202.595,199.144 202.927,198.812 203.01,198.729 ccw(c203.08,198.799) 203.151,198.729 203.291,198.869 ccw(c203.221,198.939) 203.291,199.009 203.278,199.023 cw(c203.348,199.093) 203.278,199.163 203.348,199.233 203.348,211.174 204.384,212.21 v15(204.384,212.652)
DDR4_A11: R50.1 U1.AE28 U8.T2 U9.T2 U10.T2 U11.T2 | length 91.4
  L1 w0.116: U9.T2@171.206,215.448 v2(171.609,215.852) ; U11.T2@182.666,215.448 v2(183.07,215.852) ; v6(185.44,190.44) U1.AE28@185.927,190.927 ; U10.T2@194.127,215.448 v1(194.53,215.852) ; v2(205.184,215.852) U8.T2@205.587,215.448
  L5 (Sign) w0.092: v2(171.609,215.852) 172.269,216.511 172.526,216.511 172.713,216.699 179.706,216.699 179.894,216.511 180.118,216.511 181.173,215.456 181.874,215.456 182.27,215.852 v2(183.07,215.852) 183.729,216.511 183.986,216.511 184.174,216.699 191.167,216.699 191.354,216.511 191.578,216.511 192.634,215.456 193.334,215.456 193.73,215.852 v1(194.53,215.852) 194.53,217.492 194.653,217.614 195.25,217.614 199.479,217.614 201.217,217.614 cw(c201.217,217.525) 201.306,217.525 201.306,217.428 ccw(c201.396,217.428) 201.396,217.338 201.664,217.338 ccw(c201.664,217.428) 201.754,217.428 201.754,217.614 201.754,217.801 cw(c201.844,217.801) 201.844,217.891 202.112,217.891 cw(c202.112,217.801) 202.202,217.801 202.202,217.614 202.202,217.428 ccw(c202.291,217.428) 202.291,217.338 202.56,217.338 ccw(c202.56,217.428) 202.65,217.428 202.65,217.614 202.65,217.801 cw(c202.739,217.801) 202.739,217.891 203.008,217.891 cw(c203.008,217.801) 203.097,217.801 203.097,217.614 203.097,217.428 ccw(c203.187,217.428) 203.187,217.338 203.456,217.338 ccw(c203.456,217.428) 203.545,217.428 203.545,217.525 cw(c203.635,217.525) 203.635,217.614 203.769,217.614 204.063,217.321 204.063,215.719 204.326,215.456 204.795,215.456 v2(205.184,215.852)
  L3 (Sign) w0.092: v6@185.378,190.378 v6(185.44,190.44) 185.091,190.44 183.579,188.927 182.473,188.927 182.119,189.281 182.119,189.316 182.105,189.329 182.105,189.529 182.119,189.542 182.119,189.547 182.307,189.735 182.313,189.735 182.397,189.82 182.397,193.954 185.855,197.412 185.925,197.482 ccw(c185.855,197.552) 185.925,197.622 185.917,197.63 cw(c185.987,197.7) 185.917,197.771 186.057,197.911 cw(c186.128,197.841) 186.198,197.911 186.206,197.903 ccw(c186.276,197.973) 186.346,197.903 186.836,198.393 187.316,198.873 191.275,202.832 191.275,209.76 191.847,210.332 191.847,211.344 192.657,212.153 195.58,212.153 200.52,217.094 203.594,217.094 204.515,216.173 204.863,216.173 v2(205.184,215.852)
DDR4_A12: R51.1 U1.AH29 U8.M4 U9.M4 U10.M4 U11.M4 | length 90.3
  L1 w0.116: U9.M4@167.206,212.248 167.602,212.645 v2(167.605,212.645) ; U11.M4@178.666,212.248 179.063,212.645 v2(179.065,212.645) ; U1.AH29@188.927,191.927 v6(189.414,192.414) ; U10.M4@190.127,212.248 190.523,212.645 v2(190.526,212.645) ; U8.M4@201.587,212.248 201.984,212.645 v2(201.986,212.645) v2@201.94,212.69
  L12 (Sign) w0.092: 165.888,212.638 166.203,212.324 167.076,212.324 167.397,212.645 v2(167.605,212.645) 167.605,212.639 168.141,212.103 177.679,212.103 177.825,212.248 178.639,212.248 179.036,212.645 v2(179.065,212.645) 179.798,212.645 180.438,212.004 184.14,212.004 185.217,213.081 188.366,213.081 189.123,212.324 189.997,212.324 190.318,212.645 v2(190.526,212.645) 191.067,212.103 191.101,212.103 191.221,211.983 191.415,211.983 ccw(c191.415,212.013) 191.445,212.013 cw(c191.534,212.013) 191.534,212.103 191.803,212.103 cw(c191.803,212.013) 191.893,212.013 191.893,211.983 191.893,211.655 ccw(c191.982,211.655) 191.982,211.566 192.251,211.566 ccw(c192.251,211.655) 192.34,211.655 192.34,211.983 cw(c192.43,211.983) 192.43,212.073 192.699,212.073 cw(c192.699,211.983) 192.788,211.983 192.788,211.655 ccw(c192.878,211.655) 192.878,211.566 193.146,211.566 ccw(c193.146,211.655) 193.236,211.655 193.236,211.894 cw(c193.326,211.894) 193.326,211.983 194.373,211.983 200.605,211.983 200.787,212.165 201.161,212.165 201.685,212.69 201.94,212.69 v2(201.986,212.645)
  L3 (Sign) w0.092: v6(189.414,192.414) 189.735,192.093 191.258,192.093 198.916,199.752 199.295,199.752 200.04,200.497 200.04,203.663 199.936,203.767 199.936,205.372 199.936,205.629 cw(c200.001,205.629) 200.001,205.693 ; 199.987,205.693 ccw(c199.987,205.793) 200.087,205.793 200.087,205.991 ccw(c199.987,205.991) 199.987,206.09 199.936,206.09 198.933,206.09 cw(c198.933,206.19) 198.834,206.19 198.834,206.388 cw(c198.933,206.388) 198.933,206.487 199.936,206.487 ccw(c199.936,206.564) 200.013,206.564 200.013,206.808 ccw(c199.936,206.808) 199.936,206.884 198.933,206.884 cw(c198.933,206.984) 198.834,206.984 198.834,207.182 cw(c198.933,207.182) 198.933,207.281 199.936,207.281 200.391,207.281 ccw(c200.391,207.381) 200.49,207.381 200.49,207.579 ccw(c200.391,207.579) 200.391,207.678 199.936,207.678 198.933,207.678 cw(c198.933,207.778) 198.834,207.778 198.834,207.976 cw(c198.933,207.976) 198.933,208.075 199.936,208.075 200.345,208.075 ccw(c200.345,208.175) 200.444,208.175 200.444,208.373 ccw(c200.345,208.373) 200.345,208.472 199.936,208.472 198.933,208.472 cw(c198.933,208.572) 198.834,208.572 198.834,208.77 cw(c198.933,208.77) 198.933,208.869 199.936,208.869 199.996,208.869 ccw(c199.996,208.969) 200.095,208.969 200.095,209.167 ccw(c199.996,209.167) 199.996,209.266 199.936,209.266 198.933,209.266 cw(c198.933,209.366) 198.834,209.366 198.834,209.564 cw(c198.933,209.564) 198.933,209.663 199.936,209.663 200.018,209.663 ccw(c200.018,209.763) 200.117,209.763 200.117,209.961 ccw(c200.018,209.961) 200.018,210.06 199.936,210.06 198.933,210.06 cw(c198.933,210.16) 198.834,210.16 198.834,210.358 cw(c198.933,210.358) 198.933,210.457 199.936,210.457 200.448,210.457 ccw(c200.448,210.557) 200.547,210.557 200.547,210.755 ccw(c200.448,210.755) 200.448,210.854 199.936,210.854 199.395,210.854 cw(c199.395,210.954) 199.296,210.954 199.296,211.152 cw(c199.395,211.152) 199.395,211.251 199.936,211.251 200.495,211.251 ccw(c200.495,211.351) 200.594,211.351 200.594,211.549 ccw(c200.495,211.549) 200.495,211.648 200.035,211.648 cw(c200.035,211.748) 199.936,211.748 199.936,211.847 200.337,212.248 201.589,212.248 v2(201.986,212.645) ; 199.988,205.693 200,205.693
DDR4_A13: R53.1 U1.AH28 U8.T5 U9.T5 U10.T5 U11.T5 | length 96.9
  L1 w0.116: U9.T5@166.406,215.448 166.804,215.847 v1(166.804,215.976) ; U11.T5@177.866,215.448 178.263,215.845 v2(178.265,215.845) ; v6(188.57,190.436) 188.57,190.57 U1.AH28@188.927,190.927 ; U10.T5@189.327,215.448 189.725,215.847 v2(189.725,215.976) ; U8.T5@200.787,215.448 201.184,215.845 v2(201.186,215.845)
  L12 (Sign) w0.092: 165.806,215.735 166.048,215.976 v1(166.804,215.976) 167.101,215.976 167.686,216.56 173.04,216.56 173.756,215.845 ; v2@178.263,215.845 173.756,215.845 ; v2(178.265,215.845) 180.005,215.845 ; v2(201.186,215.845) 200.914,215.845 200.78,215.845 ccw(c200.78,215.755) 200.69,215.755 200.69,215.701 cw(c200.601,215.701) 200.601,215.612 200.332,215.612 cw(c200.332,215.701) 200.242,215.701 200.242,215.845 200.242,216.566 ccw(c200.153,216.566) 200.153,216.656 199.884,216.656 ccw(c199.884,216.566) 199.795,216.566 199.795,215.934 cw(c199.705,215.934) 199.705,215.845 199.682,215.845 198.966,216.56 190.606,216.56 190.022,215.976 ; 173.756,215.845 180.005,215.845 ; 180.005,215.845 180.784,216.624 183.528,216.624 184.671,215.481 188.473,215.481 188.968,215.976 ; 188.968,215.976 190.022,215.976 ; 188.968,215.976 v2(189.725,215.976) 190.022,215.976
  L3 (Sign) w0.092: v6(188.57,190.436) 188.57,190.57 189.078,191.078 189.078,191.26 189.378,191.56 189.378,191.696 189.155,191.919 189.155,191.935 188.901,192.189 188.901,193.355 189.323,193.777 189.547,193.777 189.688,193.917 cw(c189.729,193.959) 189.688,194 189.885,194.198 cw(c189.927,194.156) 189.969,194.198 190.406,193.76 ccw(c190.477,193.83) 190.547,193.76 190.687,193.9 ccw(c190.617,193.97) 190.687,194.04 190.249,194.478 cw(c190.291,194.52) 190.249,194.562 190.447,194.759 cw(c190.488,194.718) 190.53,194.759 191.502,193.787 ccw(c191.572,193.857) 191.642,193.787 191.783,193.928 ccw(c191.712,193.998) 191.783,194.068 190.811,195.04 cw(c190.852,195.081) 190.811,195.123 191.008,195.321 cw(c191.05,195.279) 191.091,195.321 191.347,195.065 ccw(c191.417,195.135) 191.487,195.065 191.628,195.205 ccw(c191.558,195.275) 191.628,195.346 191.372,195.601 cw(c191.414,195.643) 191.372,195.684 191.57,195.882 cw(c191.611,195.84) 191.653,195.882 191.909,195.626 ccw(c191.979,195.697) 192.049,195.626 192.189,195.767 ccw(c192.119,195.837) 192.189,195.907 191.934,196.163 cw(c191.975,196.204) 191.934,196.246 192.131,196.443 cw(c192.173,196.402) 192.214,196.443 192.47,196.188 ccw(c192.54,196.258) 192.61,196.188 192.751,196.328 ccw(c192.681,196.398) 192.751,196.469 192.495,196.724 cw(c192.537,196.766) 192.495,196.807 192.693,197.005 cw(c192.734,196.963) 192.776,197.005 193.031,196.749 ccw(c193.102,196.819) 193.172,196.749 193.312,196.89 ccw(c193.242,196.96) 193.312,197.03 193.057,197.286 cw(c193.098,197.327) 193.057,197.369 193.254,197.566 cw(c193.296,197.525) 193.337,197.566 193.593,197.822 193.663,197.892 cw(c193.733,197.822) 193.804,197.892 193.989,197.707 ccw(c194.059,197.777) 194.129,197.707 194.27,197.847 ccw(c194.2,197.917) 194.27,197.988 194.014,198.243 cw(c194.056,198.285) 194.014,198.326 194.212,198.524 cw(c194.253,198.482) 194.295,198.524 194.55,198.268 ccw(c194.621,198.338) 194.691,198.268 194.831,198.409 ccw(c194.761,198.479) 194.831,198.549 194.576,198.805 cw(c194.617,198.846) 194.576,198.888 194.773,199.085 cw(c194.815,199.044) 194.856,199.085 195.112,198.83 ccw(c195.182,198.9) 195.252,198.83 195.393,198.97 ccw(c195.322,199.04) 195.393,199.11 195.137,199.366 cw(c195.179,199.408) 195.137,199.449 195.335,199.647 cw(c195.376,199.605) 195.418,199.647 196.589,198.476 ccw(c196.659,198.546) 196.729,198.476 196.869,198.616 ccw(c196.799,198.686) 196.869,198.757 195.698,199.928 cw(c195.758,199.987) 195.698,200.047 195.859,200.208 cw(c195.919,200.148) 195.979,200.208 196.26,200.489 196.289,200.518 196.71,200.939 196.71,209.779 200.698,213.766 201.506,213.766 201.665,213.926 201.665,214.377 201.853,214.565 ; v2(201.186,215.845) 201.909,215.845 202.146,215.608 202.146,214.858 201.854,214.565
DDR4_ACT_N: R40.1 U1.AD26 U8.L3 U9.L3 U10.L3 U11.L3 | length 91
  L1 w0.116: v2(170.002,211.044) U9.L3@170.406,211.448 ; v2(181.463,211.044) U11.L3@181.866,211.448 ; U1.AD26@184.927,188.927 185.421,189.421 v6(185.547,189.421) ; v2(192.923,211.044) U10.L3@193.327,211.448 ; U8.L3@204.787,211.448 v15(205.191,211.044)
  L5 (Sign) w0.092: v2(170.002,211.044) 170.354,211.396 172.593,211.396 173.373,210.617 180.357,210.617 180.784,211.044 v2(181.463,211.044) 181.925,211.507 183.943,211.507 184.795,210.655 192.225,210.655 192.614,211.044 v2(192.923,211.044) 193.346,211.468 194.723,211.468 ; v15(205.191,211.044) 205.191,211.052 205.505,211.365 205.505,212.008 205.296,212.217 204.94,212.217 204.241,211.518 202.501,211.518 202.197,211.214 200.469,211.214 200.335,211.214 ccw(c200.335,211.124) 200.246,211.124 200.246,210.89 cw(c200.156,210.89) 200.156,210.8 199.887,210.8 cw(c199.887,210.89) 199.798,210.89 199.798,211.214 199.798,211.556 ccw(c199.708,211.556) 199.708,211.646 199.44,211.646 ccw(c199.44,211.556) 199.35,211.556 199.35,211.214 199.35,210.898 cw(c199.26,210.898) 199.26,210.808 198.992,210.808 cw(c198.992,210.898) 198.902,210.898 198.902,211.124 ccw(c198.813,211.124) 198.813,211.214 198.768,211.214 195.008,211.214 194.977,211.214 194.935,211.256 ; 194.723,211.468 194.935,211.256 ; 194.723,211.468 194.935,211.256
  L3 (Sign) w0.092: v6(185.547,189.421) 185.725,189.421 186.081,189.776 186.528,189.776 186.569,189.735 186.573,189.735 186.761,189.547 186.761,188.922 187.155,188.527 187.155,187.342 188.492,186.006 191.746,186.006 203.732,197.992 203.732,198.19 203.732,198.488 cw(c203.831,198.488) 203.831,198.587 204.216,198.587 ccw(c204.216,198.686) 204.315,198.686 204.315,198.885 ccw(c204.216,198.885) 204.216,198.984 203.831,198.984 cw(c203.831,199.083) 203.732,199.083 203.732,199.282 cw(c203.831,199.282) 203.831,199.381 204.216,199.381 ccw(c204.216,199.48) 204.315,199.48 204.315,199.679 ccw(c204.216,199.679) 204.216,199.778 203.831,199.778 cw(c203.831,199.877) 203.732,199.877 203.732,200.076 cw(c203.831,200.076) 203.831,200.175 204.05,200.175 ccw(c204.05,200.274) 204.149,200.274 204.149,200.473 ccw(c204.05,200.473) 204.05,200.572 203.831,200.572 cw(c203.831,200.671) 203.732,200.671 203.732,200.87 cw(c203.831,200.87) 203.831,200.969 204.05,200.969 ccw(c204.05,201.068) 204.149,201.068 204.149,201.267 ccw(c204.05,201.267) 204.05,201.366 203.831,201.366 cw(c203.831,201.465) 203.732,201.465 203.732,201.664 cw(c203.831,201.664) 203.831,201.763 204.15,201.763 ccw(c204.15,201.862) 204.25,201.862 204.25,202.061 ccw(c204.15,202.061) 204.15,202.16 203.831,202.16 cw(c203.831,202.259) 203.732,202.259 203.732,202.458 cw(c203.831,202.458) 203.831,202.557 203.928,202.557 ccw(c203.928,202.656) 204.027,202.656 204.027,202.855 ccw(c203.928,202.855) 203.928,202.954 203.831,202.954 cw(c203.831,203.053) 203.732,203.053 203.732,203.252 cw(c203.831,203.252) 203.831,203.351 204.12,203.351 ccw(c204.12,203.45) 204.22,203.45 204.22,203.649 ccw(c204.12,203.649) 204.12,203.748 203.831,203.748 cw(c203.831,203.847) 203.732,203.847 203.732,204.046 cw(c203.831,204.046) 203.831,204.145 203.933,204.145 ccw(c203.933,204.244) 204.032,204.244 204.032,204.443 ccw(c203.933,204.443) 203.933,204.542 203.831,204.542 cw(c203.831,204.641) 203.732,204.641 203.732,204.84 cw(c203.831,204.84) 203.831,204.939 204.101,204.939 ccw(c204.101,205.038) 204.2,205.038 204.2,205.237 ccw(c204.101,205.237) 204.101,205.336 203.831,205.336 cw(c203.831,205.435) 203.732,205.435 203.732,207.442 203.732,210.011 203.88,210.158 203.88,210.598 204.114,210.833 204.737,210.833 204.948,211.044 v15(205.191,211.044)
DDR4_ALERT_N: R58.1 U1.AB24 U8.P6 U9.P6 U10.P6 U11.P6
DDR4_BA0: R32.1 U1.AD27 U8.N2 U9.N2 U10.N2 U11.N2 | length 92.8
  L1 w0.116: U9.N2@171.206,213.048 v2(171.609,213.452) ; U11.N2@182.666,213.048 v2(183.07,213.452) ; v6(184.442,189.306) 184.442,189.442 U1.AD27@184.927,189.927 ; U10.N2@194.127,213.048 v2(194.53,213.452) ; U8.N2@205.587,213.048 v15(205.969,213.429)
  L5 (Sign) w0.092: 170.156,213.081 170.526,213.081 170.897,213.452 v2(171.609,213.452) 172.397,213.452 172.781,213.068 182.268,213.068 182.652,213.452 v2(183.07,213.452) 183.601,213.452 183.967,213.086 193.617,213.086 193.982,213.452 v2(194.53,213.452) ; 195.809,213.452 v2(194.53,213.452) ; v15(205.969,213.429) 205.55,213.429 205.177,213.056 202.184,213.056 201.848,213.056 cw(c201.848,213.115) 201.789,213.115 ccw(c201.699,213.115) 201.699,213.204 201.43,213.204 ccw(c201.43,213.115) 201.341,213.115 cw(c201.282,213.115) 201.282,213.056 201.117,213.056 200.721,213.452 200.587,213.452 ccw(c200.587,213.362) 200.497,213.362 200.497,212.925 cw(c200.407,212.925) 200.407,212.836 200.139,212.836 cw(c200.139,212.925) 200.049,212.925 200.049,213.452 200.049,213.598 ccw(c199.96,213.598) 199.96,213.687 199.691,213.687 ccw(c199.691,213.598) 199.601,213.598 199.601,213.452 199.601,212.925 cw(c199.512,212.925) 199.512,212.836 199.243,212.836 cw(c199.243,212.925) 199.154,212.925 199.154,213.452 199.154,213.598 ccw(c199.064,213.598) 199.064,213.687 198.795,213.687 ccw(c198.795,213.598) 198.706,213.598 198.706,213.452 198.706,213.148 cw(c198.616,213.148) 198.616,213.058 198.348,213.058 cw(c198.348,213.148) 198.258,213.148 198.258,213.452 198.258,213.598 ccw(c198.168,213.598) 198.168,213.687 197.9,213.687 ccw(c197.9,213.598) 197.81,213.598 197.81,213.452 197.81,213.229 cw(c197.721,213.229) 197.721,213.14 197.452,213.14 cw(c197.452,213.229) 197.362,213.229 197.362,213.362 ccw(c197.273,213.362) 197.273,213.452 196.215,213.452 v2(194.53,213.452)
  L3 (Sign) w0.092: v6(184.442,189.306) 184.442,189.043 184.842,188.643 184.842,188.216 185.279,187.779 185.286,187.785 185.618,187.785 188.209,185.195 192.021,185.195 192.06,185.233 192.068,185.233 206.772,199.937 206.772,200.037 ccw(c206.672,200.037) 206.672,200.136 206.412,200.136 cw(c206.412,200.235) 206.313,200.235 206.313,200.434 cw(c206.412,200.434) 206.412,200.533 206.772,200.533 207.132,200.533 ccw(c207.132,200.632) 207.231,200.632 207.231,200.831 ccw(c207.132,200.831) 207.132,200.93 206.871,200.93 cw(c206.871,201.029) 206.772,201.029 206.772,201.228 cw(c206.871,201.228) 206.871,201.327 207.132,201.327 ccw(c207.132,201.426) 207.231,201.426 207.231,201.625 ccw(c207.132,201.625) 207.132,201.724 206.871,201.724 cw(c206.871,201.823) 206.772,201.823 206.772,202.286 206.772,212.392 206.195,212.968 206.195,213.203 v15(205.969,213.429)
DDR4_BA1: R34.1 U1.AC26 U8.N5 U9.N5 U10.N5 U11.N5 | length 88.6
  L1 w0.116: U9.N5@166.406,213.048 166.802,213.445 v1(166.805,213.445) ; U11.N5@177.866,213.048 178.263,213.445 v2(178.265,213.445) ; v6(183.44,189.414) U1.AC26@183.927,188.927 ; U10.N5@189.327,213.048 189.723,213.445 v2(189.726,213.445) ; U8.N5@200.787,213.048 201.184,213.445 v2(201.186,213.445)
  L12 (Sign) w0.092: 165.872,213.848 166.275,213.445 v1(166.805,213.445) 167.041,213.445 167.389,213.792 171.999,213.792 172.346,213.445 v2(178.265,213.445) 178.511,213.69 178.857,213.69 178.932,213.765 178.943,213.765 179.046,213.868 184.053,213.868 184.511,214.325 188.316,214.325 189.196,213.445 189.988,213.445 190.335,213.792 191.16,213.792 194.92,213.792 195.517,213.195 195.618,213.195 195.631,213.195 196.253,213.195 198.593,213.195 ccw(c198.593,213.284) 198.683,213.284 198.683,213.396 cw(c198.773,213.396) 198.773,213.486 199.041,213.486 cw(c199.041,213.396) 199.131,213.396 199.131,213.195 199.131,213.032 ccw(c199.22,213.032) 199.22,212.942 199.489,212.942 ccw(c199.489,213.032) 199.579,213.032 199.579,213.195 199.579,213.396 cw(c199.668,213.396) 199.668,213.486 199.937,213.486 cw(c199.937,213.396) 200.026,213.396 200.026,213.195 200.026,213.032 ccw(c200.116,213.032) 200.116,212.942 200.385,212.942 ccw(c200.385,213.032) 200.474,213.032 200.474,213.105 cw(c200.564,213.105) 200.564,213.195 200.698,213.195 200.948,213.445 v2(201.186,213.445)
  L3 (Sign) w0.092: v6(183.44,189.414) 183.44,190.068 183.892,190.52 183.892,191.461 183.632,191.721 183.632,191.768 183.173,192.227 183.093,192.307 183.093,192.573 183.281,192.761 183.464,192.761 183.694,192.991 183.937,192.991 184.039,193.093 185.28,193.093 ; 185.281,193.093 185.644,193.093 186.065,193.514 188.066,195.547 188.278,195.762 cw(c188.349,195.692) 188.419,195.763 188.512,195.671 ccw(c188.582,195.742) 188.653,195.672 188.792,195.814 ccw(c188.721,195.883) 188.791,195.954 188.626,196.116 188.1,196.634 cw(c188.17,196.704) 188.099,196.774 188.239,196.915 cw(c188.309,196.846) 188.379,196.916 188.905,196.399 ccw(c188.975,196.469) 189.045,196.4 189.185,196.541 ccw(c189.114,196.611) 189.183,196.682 188.662,197.195 cw(c188.731,197.266) 188.661,197.335 188.8,197.477 cw(c188.871,197.407) 188.94,197.478 189.391,197.034 ccw(c189.461,197.105) 189.532,197.035 189.671,197.177 ccw(c189.6,197.246) 189.67,197.317 189.223,197.756 cw(c189.293,197.827) 189.222,197.897 189.361,198.038 cw(c189.432,197.969) 189.502,198.039 189.948,197.6 ccw(c190.018,197.671) 190.089,197.601 190.298,197.813 190.437,197.955 192.204,199.721 192.204,209.132 192.552,209.481 192.552,209.598 192.769,209.815 192.794,209.815 192.794,209.84 192.821,209.867 193.346,209.867 193.616,210.137 193.649,210.137 194.16,210.648 195.24,210.648 200.757,216.166 201.876,216.166 202.387,215.654 202.387,214.02 202.197,213.83 201.913,213.83 201.528,213.445 v2(201.186,213.445)